# Altium PCB TYH-PD67W 2C1A 合板(2).pcbdoc
Units mm, origin at the board's own origin, x right, y up, seen from the top; angles counter-clockwise.
Board outline 94.32 x 66.89 mm, 4 copper layers (Top Layer, Layer 2, Layer 1, Bottom Layer), stack 1.045 mm thick; 43 components, 183 nets, 167 pads, 231 vias.
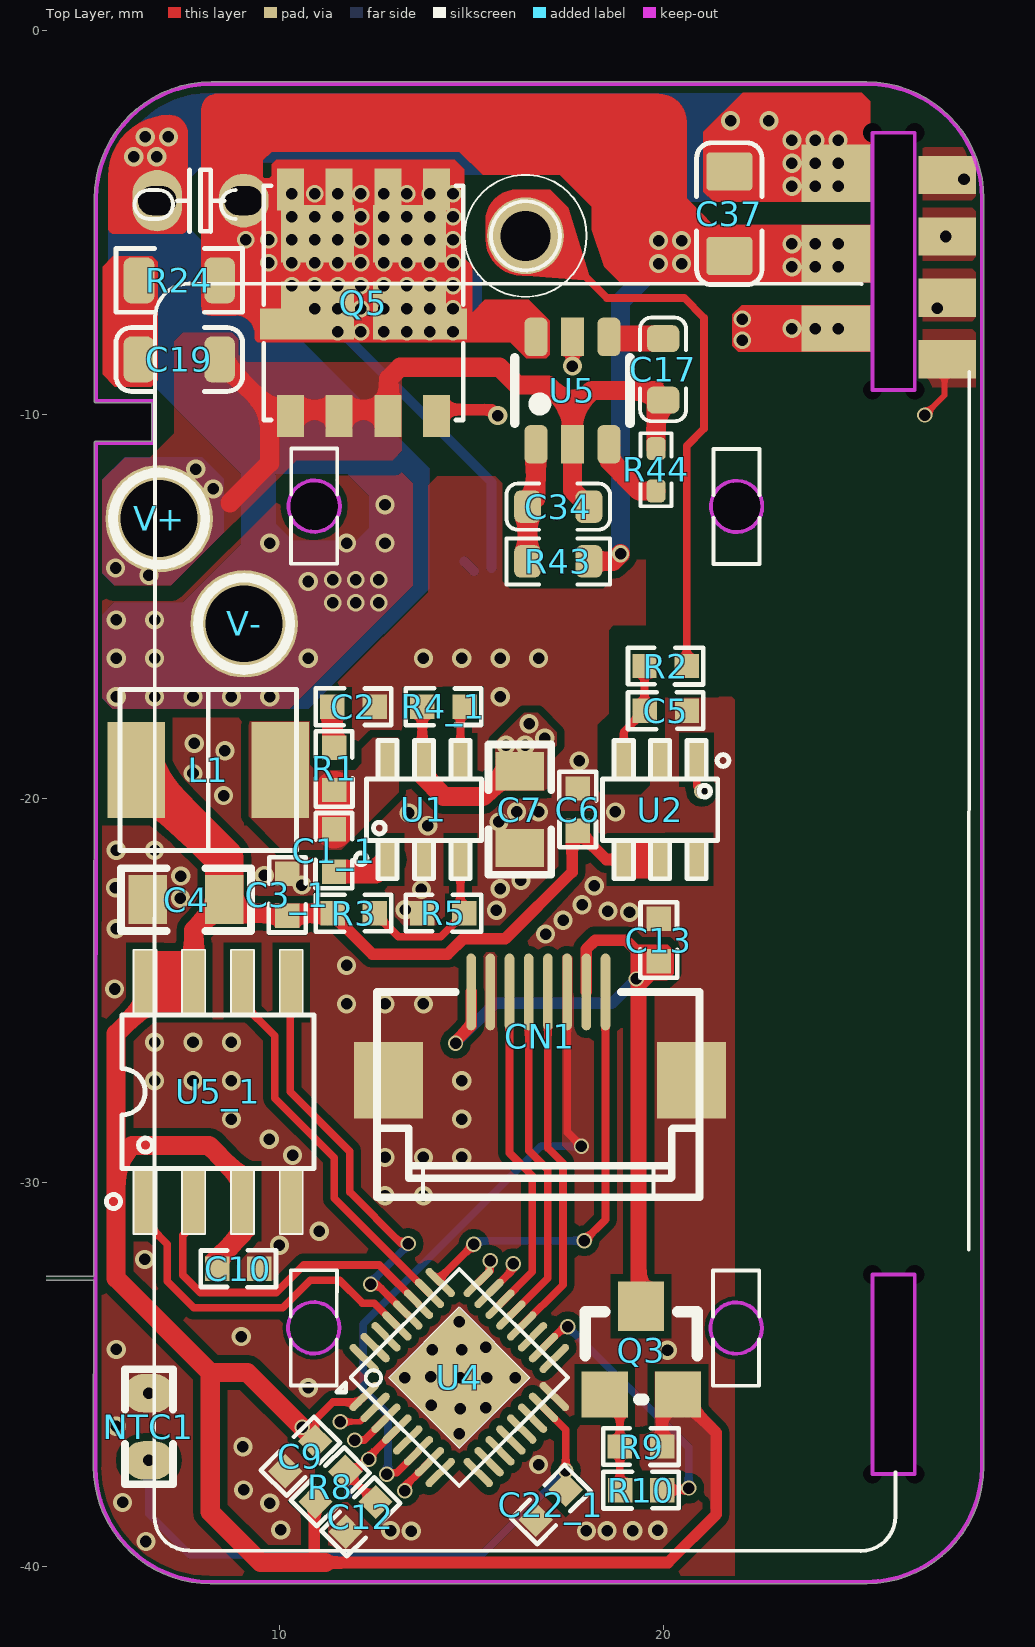
[diagram p0: Top Layer view]
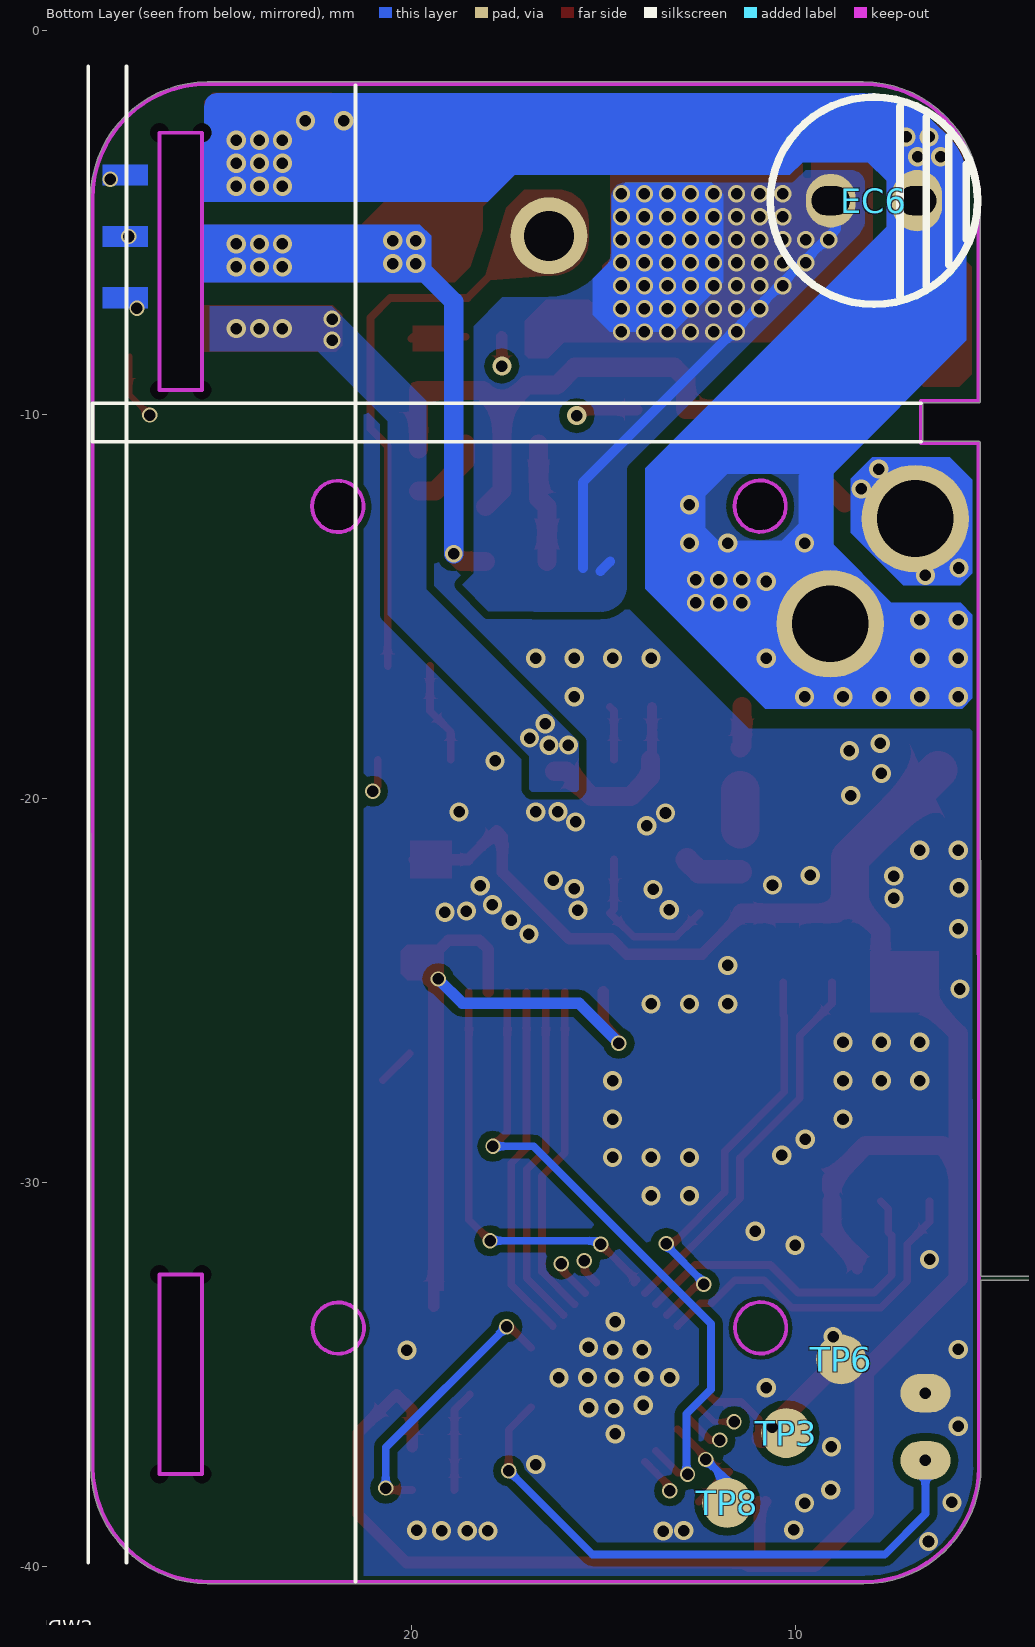
[diagram p1: Bottom Layer view, seen from below]
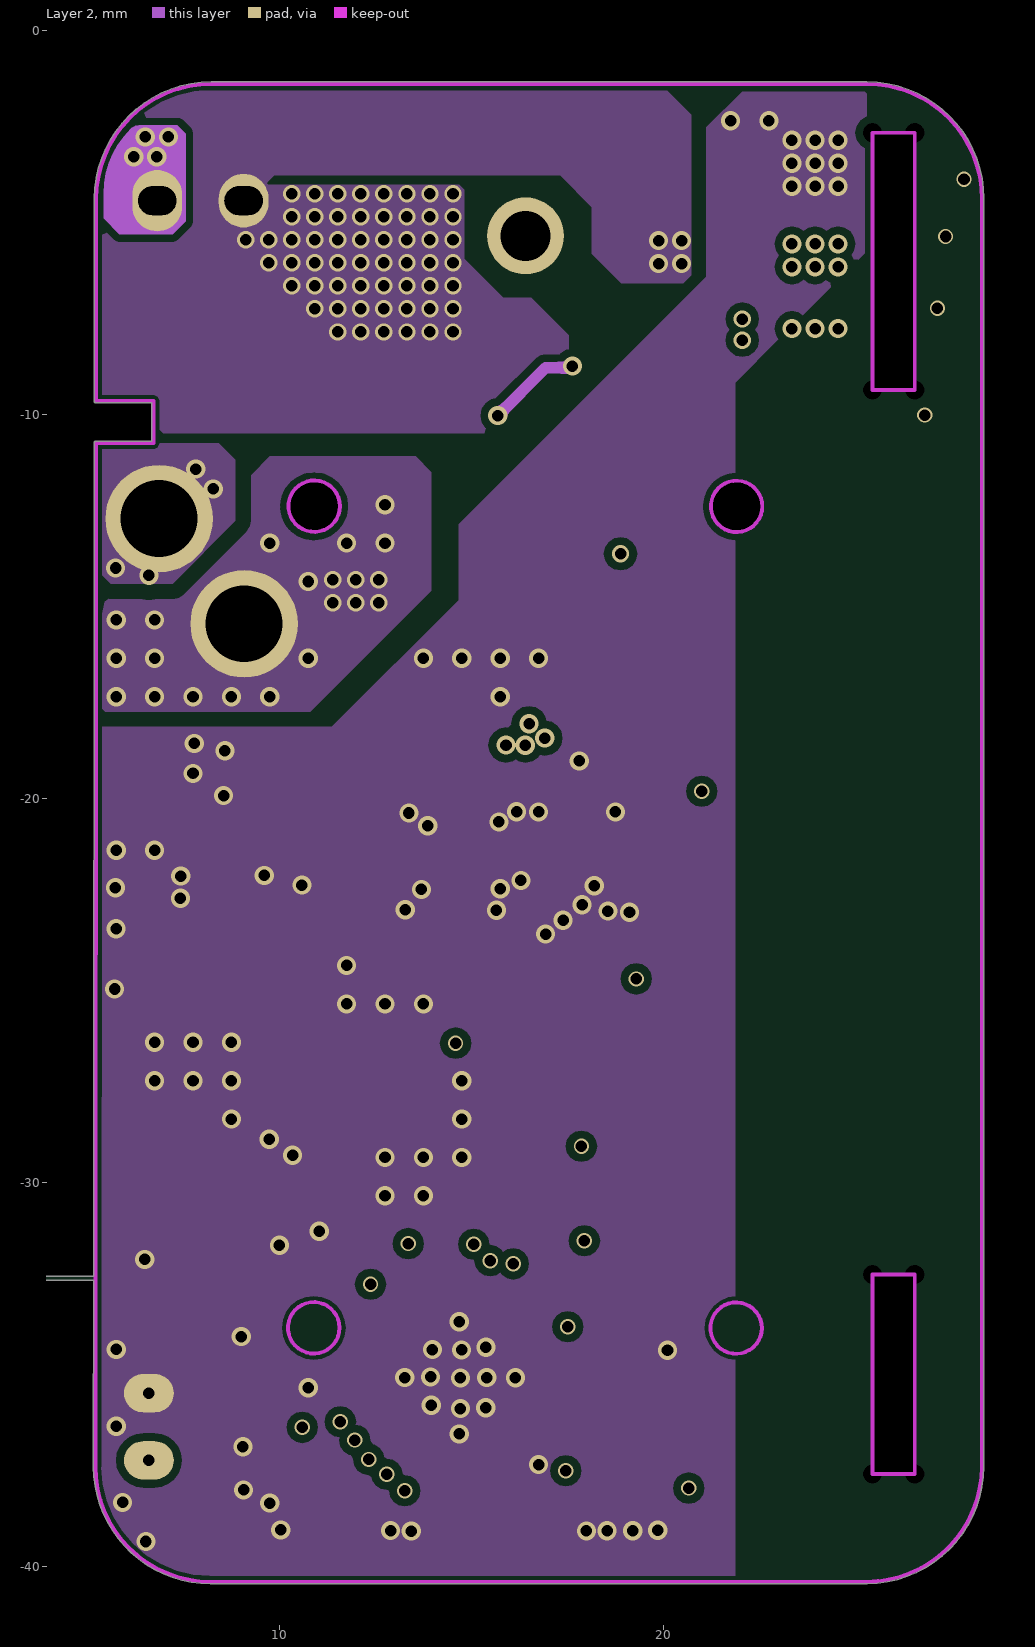
[diagram p2: Layer 2]
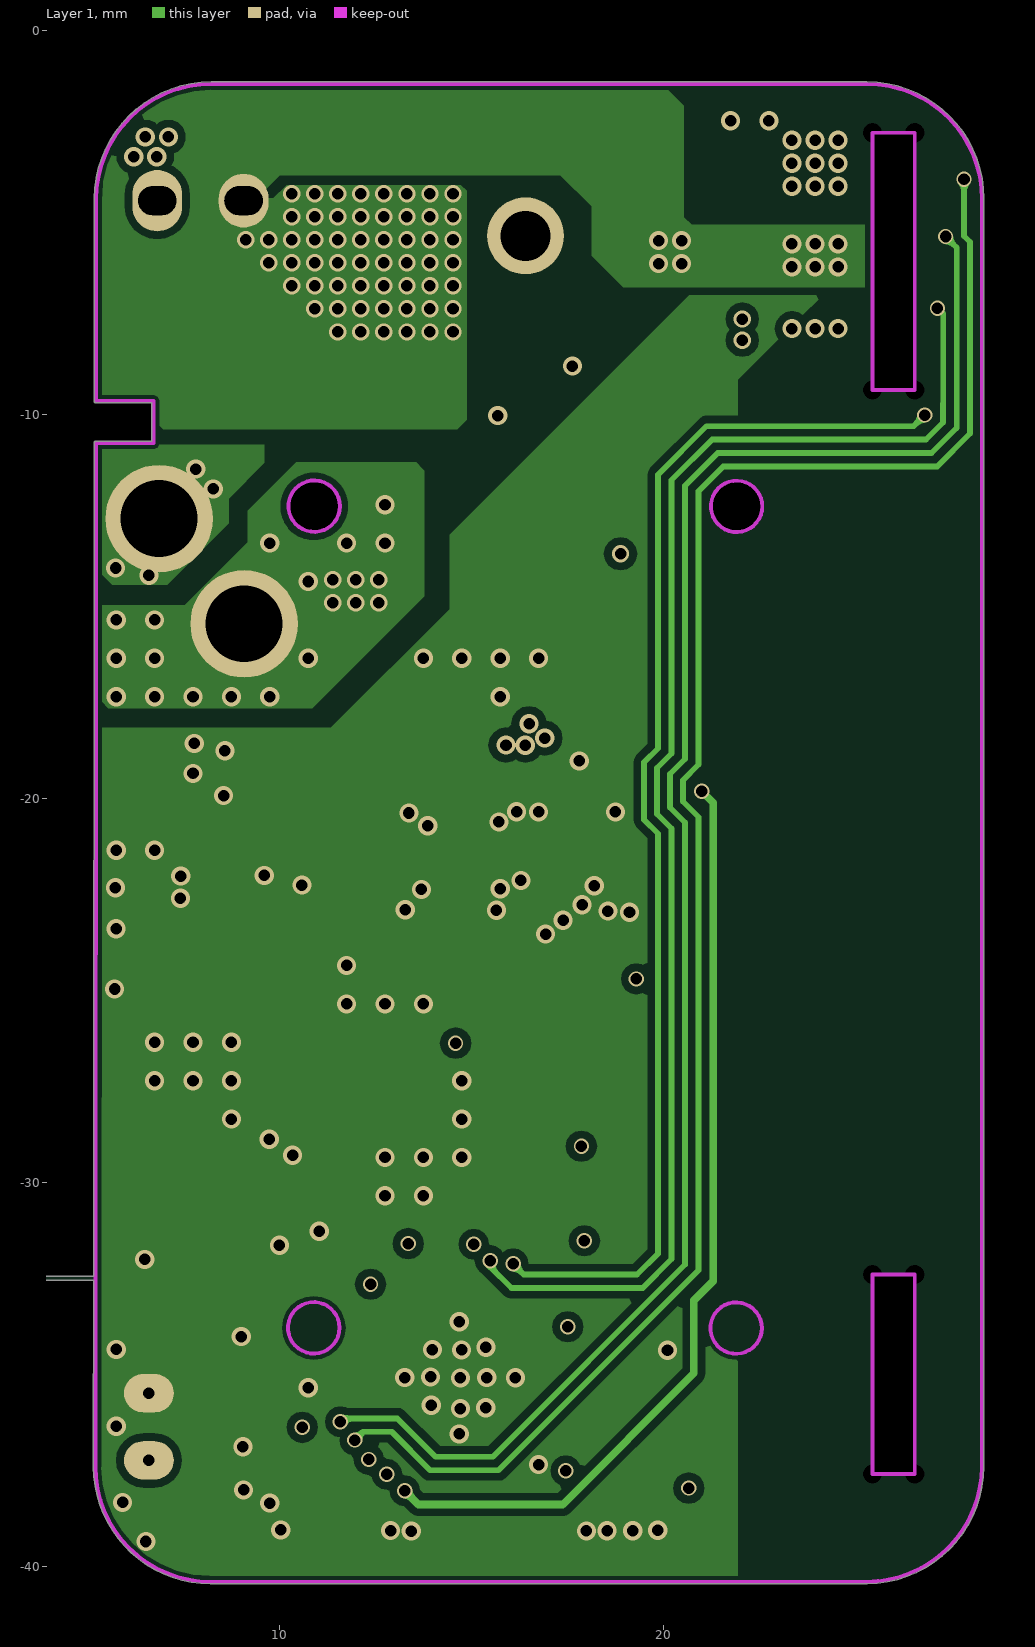
[diagram p3: Layer 1]
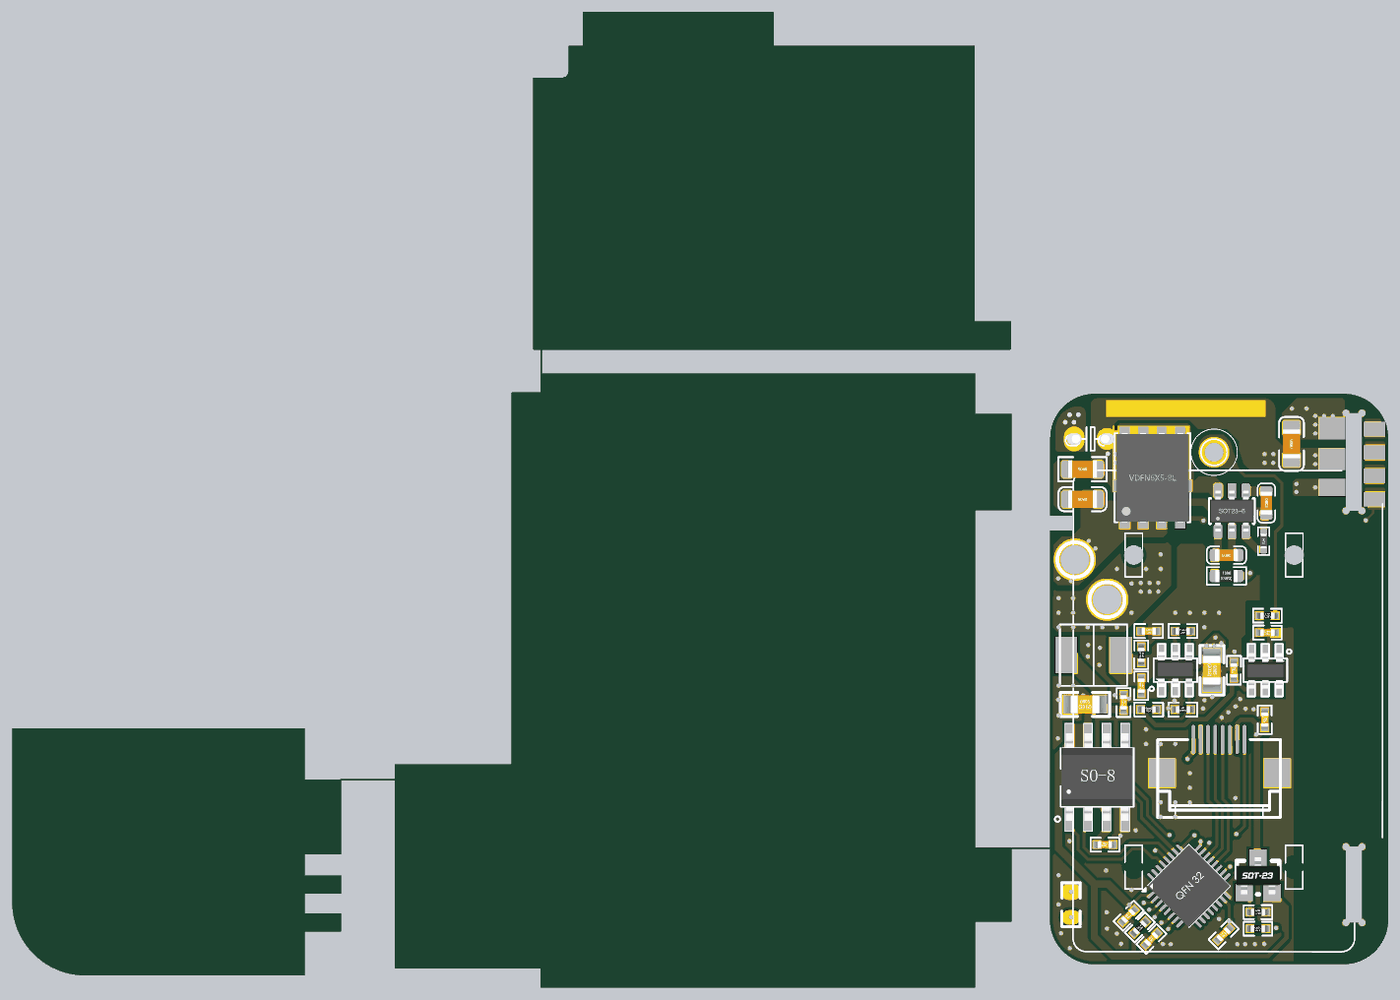
[diagram p4: 3D render of the assembled board from above, using the file's embedded part models]

## Layer stack, top to bottom
Top Solder: solder mask 0.0102, Solder Resist, Dk 3.5
Top Layer: signal copper 0.0356
Dielectric 6: prepreg 0.0711, PP-006, Dk 4.1
Layer 2: signal copper 0.035
Dielectric 5: prepreg 0.0711, PP-006, Dk 4.1
Layer 1: signal copper 0.035
Dielectric 1: core 0.254, FR-4, Dk 4.2
Dielectric 4: prepreg 0.127, Dk 4.2
Dielectric 2: core 0.254, Dk 4.2
Dielectric 3: prepreg 0.127, Dk 4.2
Bottom Layer: signal copper 0.0356
Bottom Solder: solder mask 0.0102, Solder Resist, Dk 3.5

## Board outline
-60.945,-41.225 -45.944,-41.225 ccw(c-45.944,-41.2) -45.919,-41.2 -45.919,-38.225 -43.445,-38.225 ccw(c-43.445,-38.2) -43.419,-38.2 -43.419,-37 ccw(c-43.445,-37) -43.445,-36.975 -45.919,-36.975 -45.919,-35.625 -43.445,-35.625 ccw(c-43.445,-35.6) -43.419,-35.6 -43.419,-34.4 ccw(c-43.445,-34.4) -43.445,-34.375 -45.919,-34.375 -45.919,-32.925 -43.445,-32.925 ccw(c-43.445,-32.9) -43.419,-32.9 -43.419,-27.85 -39.751,-27.85 -39.759,-40.693 ccw(c-39.709,-40.7) -39.709,-40.75 -29.759,-40.752 -29.76,-42.002 ccw(c-29.71,-42.002) -29.71,-42.052 0,-42.052 ccw(c0,-42.002) 0.05,-42.002 0.05,-37.55 2.5,-37.55 ccw(c2.5,-37.5) 2.55,-37.5 2.55,-32.55 5.163,-32.55 5.16,-37.409 ccw(c5.21,-37.409) 5.16,-37.409 ccw(c8.207,-37.409) 8.207,-40.456 ccw(c8.207,-40.406) 8.207,-40.456 ccw(c8.207,-40.406) 8.207,-40.456 25.296,-40.456 ccw(c25.296,-40.406) 25.308,-40.455 ccw(c25.296,-37.407) 28.344,-37.407 28.352,-4.393 ccw(c28.302,-4.393) 28.352,-4.393 ccw(c28.302,-4.393) 28.351,-4.381 ccw(c25.304,-4.393) 25.304,-1.346 8.229,-1.346 ccw(c8.229,-4.393) 5.181,-4.375 ccw(c5.228,-4.393) 5.178,-4.393 5.175,-9.653 ccw(c5.225,-9.653) 5.225,-9.703 6.674,-9.704 6.673,-10.703 5.225,-10.702 ccw(c5.225,-10.753) 5.174,-10.753 5.163,-32.45 0.05,-32.45 0.05,-9.32 2.5,-9.32 ccw(c2.5,-9.269) 2.55,-9.269 2.55,-2.769 ccw(c2.5,-2.769) 2.5,-2.719 0.05,-2.719 0.05,0 ccw(c0,0) 0,0.05 -29.65,0.05 -29.65,1.682 2.433,1.682 ccw(c2.433,1.733) 2.483,1.733 ccw(c2.433,1.733) 2.482,1.745 ccw(c2.45,1.784) 2.5,1.784 2.5,3.584 ccw(c2.45,3.584) 2.45,3.635 0,3.635 0,22.484 ccw(c-0.05,22.484) -0.014,22.52 ccw(c-0.05,22.484) -0.05,22.535 -13.768,22.535 -13.768,24.784 ccw(c-13.819,24.784) -13.819,24.835 -26.819,24.835 ccw(c-26.819,24.784) -26.869,24.784 -26.869,22.535 -27.789,22.535 ccw(c-27.789,22.484) -27.84,22.483 -27.84,20.784 cw(c-28.289,20.784) -28.289,20.335 cw(c-28.289,20.784) -28.289,20.335 cw(c-28.289,20.284) -28.289,20.335 -30.217,20.335 ccw(c-30.217,20.284) -30.268,20.284 -30.268,1.733 ccw(c-30.217,1.733) -30.217,1.682 -29.75,1.682 -29.75,-1.25 -31.7,-1.25 ccw(c-31.7,-1.3) -31.75,-1.3 -31.75,-26.75 -39.7,-26.75 ccw(c-39.7,-26.8) -39.75,-26.8 -39.751,-27.75 -43.445,-27.75 ccw(c-43.445,-27.8) -43.488,-27.775 -45.919,-27.775 -45.919,-24.3 ccw(c-45.945,-24.3) -45.945,-24.275 -65.945,-24.275 ccw(c-65.945,-24.3) -65.97,-24.3 -65.97,-36.2 ccw(c-60.945,-36.2)
cut-out: 25.45,-9.369 26.55,-9.369 26.55,-2.669 25.45,-2.669
cut-out: 26.55,-32.4 25.45,-32.4 25.45,-37.6 26.55,-37.6
cut-out: 22.579,-12.399 22.579,-12.398 ccw(c21.912,-12.398) 21.912,-11.731 21.902,-11.731 ccw(c21.902,-12.396) 21.237,-12.396 21.237,-12.424 ccw(c21.889,-12.424) 21.889,-13.076 21.902,-13.076 ccw(c21.902,-12.399)
cut-out: 11.579,-12.393 11.579,-12.392 ccw(c10.912,-12.392) 10.912,-11.725 10.902,-11.725 ccw(c10.902,-12.39) 10.237,-12.39 10.237,-12.418 ccw(c10.889,-12.418) 10.889,-13.07 10.902,-13.07 ccw(c10.902,-12.393)

## Design rules (kind name [scope] priority, off if disabled: settings)
Clearance Clearance_20 [InNet('VDS') vs InNet('SGND')] p1: gap=0.4
Clearance Clearance_19 [InNet('NetC4_2') vs InNet('PGND')] p2: gap=0.4
Clearance Clearance_18 [InNet('NetR15_1') vs InNet('PGND')] p3: gap=1
Clearance Clearance_17 [InNet('NetN_1') vs InNet('NetBD1_1')] p4: gap=1.55
Clearance Clearance_16 [InNet('NetN_1') vs InNet('PGND')] p5: gap=1.5
Clearance Clearance_15 [InNet('VIN') vs InNet('PGND')] p6 off: gap=5.8
Clearance Clearance_14 [InNet('CS') vs InNet('Bais-L')] p7: gap=0.45
Clearance Clearance_13 [InNet('SW') vs InNet('CS')] p8: gap=1.5
Clearance Clearance_12 [InNet('NetR15_1') vs InNet('CS')] p9: gap=1
Clearance Clearance_11 [InNet('NetBD1_3') vs InNet('CS')] p10: gap=1.1
Clearance Clearance_10 [InNet('HV') vs InNet('CS')] p11: gap=1.1
Clearance Clearance_9 [InNet('NetL2_1') vs InNet('CS')] p12: gap=1.5
Clearance Clearance_8 [InNet('NetC1_2') vs InNet('PGND')] p13: gap=1.2
Clearance Clearance_7 [InNet('NetBD1_3') vs InNet('PGND')] p14: gap=1.2
Clearance Clearance_6 [InNet('NetC2_2') vs InNet('PGND')] p15: gap=1.3
Clearance Clearance_5 [InNet('Bais-L') vs InNet('PGND')] p16: gap=0.45
Clearance Clearance_4 [InNet('SW') vs InNet('PGND')] p17: gap=1.5
Clearance Clearance_3 [InNet('HV') vs InNet('PGND')] p18: gap=1.2
Clearance Clearance_2 [InNet('NetL2_1') vs InNet('PGND')] p19: gap=1.5
Clearance Clearance_1 [OnLayer('Keep-Out Layer')] p20: gap=0.1
Clearance [All] p21: gap=0.2
PlaneConnect [All] p1: planeconnectstyle=Direct reliefexpansion=0.508 reliefentries=4 reliefconductorwidth=0.3 reliefairgap=0.254
PolygonConnect [All] p1: connectstyle=Direct reliefconductorwidth=0.3 reliefentries=4 polygonreliefangle="90 Angle" airgapwidth=0.3
RoutingVias [All] p1: holewidth=0.3 width=0.4 viastyle="Through Hole" minholewidth=0.3 minwidth=0.4 maxholewidth=0.3 maxwidth=0.4
SolderMaskExpansion [All] p1: expansion=0.05
Width [All] p1: maxlimit=10 minlimit=0.1 preferedwidth=0.2
28 further rules are at their usual default settings.

## Components (designator, comment, footprint, x,y, rotation, side; value= is the part's Value field where it differs from the comment)
C1_1 "100nF" 0402C#1 11.448,-21.343 r270 top (schematic designator C1)
C2 "1NF" 0402C#1 11.95,-17.641 r180 top
C3_1 "100NF" 0402C#1 10.232,-22.494 r270 top (schematic designator C3)
C4 "22uF" 0805C#1 7.494,-22.624 r0 top
C5 "10PF" 0402C#2 20.085,-17.743 r180 top
C6 "105P" 0402C#1 17.748,-20.318 r90 top
C7 "10uF" 0805C#1 16.281,-20.22 r270 top
C9 "100NF" 0402C#1 10.515,-37.139 r45 top
C10 "105PF" 0402C#1 8.911,-32.231 r0 top
C12 "100NF" 0402C#1 12.085,-38.713 r45 top
C13 "105P" 0402C#1 19.906,-23.672 r270 top
C17 "2.2nF/250V/0805" 0603CX#1 19.995,-8.031 r270 top (schematic designator C10)
C19 "2.2nF/250V/0805" 0805CX 8.445,-8.572 r180 top (schematic designator C10)
C22_1 "100NF" 0402C#1 17.039,-38.398 r45 top (schematic designator C22)
C34 "2.2nF/250V/0805" 0603CX#2 17.262,-12.406 r180 top (schematic designator C10)
C37 "2.2nF/250V/0805" 0805C#2 20.869,-6.628 r90 top (schematic designator C10)
CN1 "8.07A0.006200" "70W 屏座" 16.693,-25.17 r270 top locked
EC6 "560uF/25V/6.3*16" EG-5*17L 7.946,-4.438 r90 bottom
L1 "4.7uH" 电感0420 8.148,-19.265 r180 top
NTC1 "100K" NTC1 6.604,-36.405 r90 top
Q3 "APM2301" SOT23-MOS 19.34,-34.87 r0 top
Q5 "Comment" DFN5*6 10.286,-10.048 r0 top
R1 "2R" 0402R#1 11.449,-19.214 r270 top
R2 "0R" 0402R#2 20.041,-16.533 r0 top
R3 "47k" 0402R#1 11.958,-23.017 r180 top
R4_1 "100k" 0402R#1 14.294,-17.641 r180 top (schematic designator R4)
R5 "12k" 0402R#1 14.25,-22.968 r0 top
R8 "10k" 0402R#1 11.36,-37.931 r225 top
R9 "100K" 0402R#1 19.401,-36.861 r0 top
R10 "1K" 0402R#1 19.445,-38.041 r180 top
R24 "10R/1206" 0805RX 8.445,-6.513 r180 top (schematic designator R6)
R43 "51R/0402" 0603RX 17.263,-13.831 r0 top (schematic designator R9)
R44 "51R/0402" 0402R#3 19.81,-10.896 r270 top (schematic designator R9)
TP3 "V3V" 焊盘1.5*2.5mm 10.231,-36.534 r180 bottom
TP6 "GND" 焊盘1.5*2.5mm 8.802,-34.614 r180 bottom
TP8 "RST" 焊盘1.5*2.5mm 11.768,-38.353 r180 bottom
U1 "ME3121" SOT23-6 13.781,-20.298 r90 top
U2 "HD9210" SOT23-6 19.905,-20.294 r270 top
U4 "PY32F032" "QFN32 4*4" 12.212,-35.581 r315 top
U5 "Comment" SOT-23-6S 16.683,-10.783 r90 top
U5_1 "P25Q64H-SUH-IT" SOP8 8.33,-27.62 r90 top (schematic designator U5)
V+ "Comment" PAD-AC 6.869,-12.718 r0 top
V- "Comment" PAD-AC 9.083,-15.458 r0 top

## Footprints (in the part's own frame and the unit in brackets; to place one, negate y for a bottom-side part, rotate by r counter-clockwise, add the part's x,y. Pads: shape width x height; smd on the part's side, far side on the other; paste and mask are expansions set on the pad)
"70W 屏座" [mm]
  oval 2x0.25 smd: 1(-0.124,-1.698) 2(-0.124,-1.198) 3(-0.124,-0.698) 4(-0.124,-0.198) 5(-0.124,0.302) 6(-0.124,0.802) 7(-0.124,1.302) 8(-0.124,1.802)
  rect 2x1.8 smd: 2(2.176,-3.855) 2(2.176,4.045)
  silkscreen extent -0.12,-4.15 5.23,4.25
0402C#1 [mm]
  rect 0.635x0.635 smd paste-0.067 mask-0.018: 1(-0.531,-0.023) 2(0.571,-0.023)
  silkscreen extent -0.96,-0.51 1,0.46, body extent -0.72,-0.27 0.74,0.23, height 0.51
0402C#2 [mm]
  rect 0.635x0.635 smd paste-0.067: 1(-0.531,-0.023)
  rect 0.635x0.635 smd paste-0.067 mask-0.018: 2(0.571,-0.023)
  silkscreen extent -0.96,-0.51 1,0.46, body extent -0.72,-0.27 0.74,0.23, height 0.51
0402R#1 [mm]
  rect 0.635x0.635 smd paste-0.067 mask-0.018: 1(-0.531,-0.023) 2(0.571,-0.023)
  silkscreen extent -0.96,-0.51 1,0.46, body extent -0.7,-0.27 0.76,0.23, height 0.51
0402R#2 [mm]
  rect 0.635x0.635 smd paste-0.067 mask-0.018: 1(-0.531,-0.023)
  rect 0.635x0.635 smd paste-0.067: 2(0.571,-0.023)
  silkscreen extent -0.96,-0.51 1,0.46, body extent -0.7,-0.27 0.76,0.23, height 0.51
0402R#3 [mm]
  rrect50% 0.6x0.5 smd: 1(0,0) 2(1.1,0)
  silkscreen extent -0.4,-0.4 1.5,0.4, body extent 0.05,-0.25 1.05,0.25, height 0.3
0603CX#1 [mm]
  rrect50% 0.7x0.85 smd: 1(0,0) 2(1.6,0)
  silkscreen extent -0.55,-0.6 2.15,0.6, body extent 0,-0.41 1.6,0.41, height 0.81
0603CX#2 [mm]
  rrect50% 0.7x0.85 smd: 1(-0.8,0) 2(0.8,0)
  silkscreen extent -1.35,-0.6 1.35,0.6, body extent -0.8,-0.41 0.8,0.41, height 0.81
0603RX [mm]
  rrect50% 0.7x0.85 smd: 1(-0.8,0) 2(0.8,0)
  silkscreen extent -1.35,-0.6 1.35,0.6, body extent -0.77,-0.42 0.78,0.43, height 0.45
0805C#1 [mm]
  rect 1x1.27 smd: 1(-0.924,-0.016) 2(1.076,-0.016)
  silkscreen extent -1.62,-0.83 1.77,0.8, body extent -1.33,-0.65 1.48,0.6, height 0.8
0805C#2 [mm]
  rrect20% 1x1.2 smd: 1(0.75,-0.85) 2(2.95,-0.85)
  silkscreen extent 0,-1.7 3.7,0, body extent 0.85,-1.46 2.85,-0.24, height 0.51
0805CX [mm]
  rrect50% 0.8x1.2 smd: 1(0,0) 2(2.1,0)
  silkscreen extent -0.6,-0.83 2.7,0.83, body extent 0.05,-0.61 2.05,0.61, height 0.51
0805RX [mm]
  rrect50% 0.8x1.2 smd: 1(0,0) 2(2.1,0)
  silkscreen extent -0.6,-0.83 2.7,0.83, body extent 0.05,-0.61 2.05,0.61, height 0.51
DFN5*6 [mm]
  rect 0.7x1.1 smd: 1(0,0) 2(1.27,0) 3(2.54,0) 4(3.81,0) 5(3.81,5.9) 6(2.54,5.9) 7(1.27,5.9) 8(0,5.9)
  rect 1x0.8 smd: 8(-0.295,2.402) 8(4.105,2.402)
  rect 1.9x1.5 smd: 8(0.705,2.75) 8(0.705,4.75) 8(3.105,2.75) 8(3.105,4.75)
  silkscreen extent -0.69,-0.1 4.51,6, body extent -0.59,-0.1 4.41,6, height 1.06
EG-5*17L [mm]
  oval 1.4x1.3 hole 0.75 slot 1 at 90 deg: 1(0,1.125)
  oval 1.6x1.3 hole 0.75 slot 1 at 90 deg: 2(0,-1.125)
  silkscreen extent -2.7,-2.7 2.7,2.7, body extent -2.7,-2.7 2.7,2.7, height 17
NTC1 [mm]
  oval 1x1.3 hole 0.3: 1(-0.84,0) 2(0.91,0)
  silkscreen extent -1.47,-0.63 1.53,0.62
PAD-AC [mm]
  round 2.8 hole 2: 1(0,0)
  silkscreen extent -1.2,-1.2 1.2,1.2
"QFN32 4*4" [mm]
  oval 0.2x1 smd: 1(0,0) 2(0.4,0) 3(0.8,0) 4(1.2,0) 5(1.6,0) 6(2,0) 7(2.4,0) 8(2.8,0) 17(2.8,4.2) 18(2.4,4.2) 19(2,4.2) 20(1.6,4.2) 21(1.2,4.2) 22(0.8,4.2) 23(0.4,4.2) 24(0,4.2)
  oval 1x0.2 smd: 9(3.5,0.7) 10(3.5,1.1) 11(3.5,1.5) 12(3.5,1.9) 13(3.5,2.3) 14(3.5,2.7) 15(3.5,3.1) 16(3.5,3.5) 25(-0.7,3.5) 26(-0.7,3.1) 27(-0.7,2.7) 28(-0.7,2.3) 29(-0.7,1.9) 30(-0.7,1.5) 31(-0.7,1.1) 32(-0.7,0.7)
  rect 2.6x2.6 smd: 33(1.4,2.1)
  silkscreen extent -0.6,-0.42 3.4,4.1, body extent -0.59,0.09 3.41,4.09, height 0.57
SOP8 [mm]
  rect 1.7x0.6 smd: 1(-2.875,1.83) 2(-2.875,0.56) 3(-2.875,-0.71) 4(-2.875,-1.98) 5(2.825,-1.98) 6(2.825,-0.71) 7(2.825,0.56) 8(2.825,1.83)
  silkscreen extent -3.73,-2.58 3.68,2.83, body extent -3.01,-2.52 2.99,2.38, height 1.7
SOT23-6 [mm]
  rect 1x0.5 smd: 1(-1.298,0.964) 2(-1.298,0.014) 3(-1.298,-0.936) 4(1.302,-0.936) 5(1.302,0.014) 6(1.302,0.964)
  silkscreen extent -1.8,-1.49 1.8,1.8, body extent -1.16,-1.37 1.26,1.43, height 1.09
SOT23-MOS [mm]
  rect 1.2x1.3 smd: D(0.075,1.64)
  rect 1.2x1.2 smd: G(-0.865,-0.66) S(1.04,-0.66)
  silkscreen extent -1.37,-0.79 1.55,1.5, body extent -1.41,-0.79 1.59,1.76, height 1
SOT-23-6S [mm]
  rrect50% 1x0.6 smd: 1(0,0) 3(0,-1.9) 4(2.8,-1.9) 6(2.8,0)
  rect 1x0.6 smd: 2(0,-0.95) 5(2.8,-0.95)
  silkscreen extent 0.55,-2.45 2.25,0.55, body extent -0.01,-2.45 2.8,0.55, height 1.15
焊盘1.5*2.5mm [mm]
  round 1.3 smd: 1(0,0)
电感0420 [mm]
  rect 1.5x2.5 smd: 1(-1.875,0) 2(1.875,0)
  silkscreen extent -2.3,-2.1 2.3,2.1

## Part data
C1_1: library part 22nF, "贴片电容：100NF/25V-X7R-0402"
C2: library part C0402, "贴片电容：1NF/50V-X7R-0402"
C3_1 C9: library part 0.1u, "贴片电容：100NF/10V-X5R-0402"
C4: "贴片电容：22UF/10V-X7R-0805"
C5: library part CAP, "贴片电容：10PF/10V-X5R-0402"
C6 C13: library part CAP, "贴片电容：105P/10V-X5R-0402"
C7: "贴片电容：10UF/35V-X7R-0805"
C10: library part 0.1u, "贴片电容：105P/10V-X5R-0402"
C12 C22_1: library part 10uF, "贴片电容：100NF/10V-X7R-0805"
C17 C19 C34 C37: library part CAP
EC6: library part CAPACITOR, "C?"
L1: "贴片电感：0420-4.7UH"
NTC1: library part RES_0603, "贴片NTC:100K-3950"
Q3: library part MOS_P, "贴片MOS：APM2301-SOT23-3"
R1: library part R0402, "贴片电阻：2R-0402-F"
R2: library part R, "贴片电阻：0R-0402-F"
R3: library part 75k, "贴片电阻：47K-0402-1%"
R4_1: "贴片电阻：100K-0402-1%"
R5: library part 10k, "贴片电阻：12K-0402-1%"
R8: "贴片电阻：10K-0402-F"
R9: library part R, "贴片电阻：100K-0402-F"
R10: library part R, "贴片电阻：1K-0402-F"
R24 R43 R44: library part Res1, "Resistor"
TP3 TP6 TP8: library part TP
U1: library part TD8113, "贴片IC：ME3121-SOT23-6"
U2: library part SOT23-MCU, "贴片触摸：HD9210-SOT23-6"
U4: library part PY32F031, "贴片IC：PY32F032-QFN32-4*4"

## Free pads (board coordinates)
  round 2 hole 1.3: 0(16.412,-5.352)
  rect 1.8x1.2 smd: 3(24.5,-7.769)
  rect 1.8x1.5 smd: 3(24.5,-5.819) 3(24.5,-3.719)
  rect 1.5x1 smd: 3(27.4,-8.569) 3(27.4,-6.969) 3(27.4,-5.369) 3(27.4,-3.769)
  round 0.2 hole 0.5: 8(26.55,-9.369) 9(25.45,-9.369) 10(25.45,-2.669) 11(26.55,-2.669) 12(25.45,-32.4) 13(26.55,-32.4) 14(25.45,-37.6) 15(26.55,-37.6)

## Via types
v1: diameter 0.5, hole 0.3, Top Layer to Bottom Layer, tented both sides, 143 vias
v2: diameter 0.45, hole 0.3, Top Layer to Bottom Layer, tented both sides, 65 vias
v3: diameter 0.4, hole 0.3, Top Layer to Bottom Layer, tented both sides, 23 vias

## Nets (pads, with @x,y where several pads share a name; then routed paths per layer and width w, separated by ;. In a path a pad name is that pad's centre, name@x,y a point inside that pad or via, vN(x,y) a via of type N, cw(c..) or ccw(c..) an arc to the next point about the centre after c; other vN are vias at no path point)
3.3V: 
A: 
A+: 
A-: 
BACK_LED: U4.19
Bais-L: 
BOOT0: U4.31
BUTTON: U2.1 U4.7 | length 26.5
  Top Layer w0.2: v3(13.266,-38.037) 13.304,-37.999 13.304,-37.883 13.626,-37.561 U4.7 ; U2.1 20.869,-19.683 v3(21.002,-19.816)
  Layer 1 w0.2: v3(13.266,-38.037) 13.625,-38.395 17.376,-38.395 20.794,-34.978 20.794,-33.08 21.301,-32.573 21.301,-20.115 v3(21.002,-19.816)
CC1: 
CC2: 
CPA: 
CS: 
D: 
D25_INT: C22_1.2 NTC1.1 U4.15 | length 15.5
  Top Layer w0.2: U4.15 17.459,-36.445 v3(17.459,-37.513)
  Bottom Layer w0.2: NTC1.1 6.604,-38.632 7.67,-39.698 15.274,-39.698 v3(17.459,-37.513)
D31_EN1: U4.11
D31_EN2: U4.10
D31_INT1: U4.13
D+: 
D-: 
DM: 
DP: 
EM: 
EN: 
EN_IC: 
FB: 
FLASH_CLK: U4.26 U5_1.6 | length 10.1
  Top Layer w0.2: U5_1.6 9.04,-25.345 9.88,-26.185 9.88,-27.814 11.433,-29.366 11.433,-30.419 U4.26
FLASH_CS: U4.29 U5_1.1 | length 9.4
  Top Layer w0.2: U5_1.1 6.5,-31.034 7.082,-31.615 7.082,-32.581 7.772,-33.272 10.089,-33.272 10.805,-32.555 11.568,-32.555 12.168,-33.155 12.473,-33.155 U4.29
FLASH_MISO: U4.27 U5_1.2 | length 9.1
  Top Layer w0.2: U5_1.2 7.57,-30.695 7.57,-31.3 7.482,-31.389 7.482,-32.416 7.938,-32.872 9.923,-32.872 10.64,-32.155 12.604,-32.155 U4.27
FLASH_MOSI: U4.28 U5_1.5 | length 11
  Top Layer w0.2: U5_1.5 10.31,-25.645 10.28,-25.675 10.28,-27.648 11.833,-29.201 11.833,-30.253 13.178,-31.598 v3(13.358,-31.598) ; v3(12.375,-32.655) 12.538,-32.655 U4.28
  Bottom Layer w0.2: v3(12.375,-32.655) 12.375,-32.618 13.358,-31.635 v3(13.358,-31.598)
G-SR: Q5.4 U5.5 | length 4.9
  Top Layer w0.3: Q5.4@14.119,-9.878 15.529,-9.878 v1(15.686,-10.035) ; v1(17.633,-8.744) U5.5
  Layer 2 w0.3: v1(15.686,-10.035) 16.933,-8.788 v1@17.707,-8.788
GND: 
GND-C: 
HV: 
ISET: 
KEY: 
KEY1: 
LCD_CLK: 
LCD_CS: CN1.8 U4.25 | length 11.1
  Top Layer w0.2: U4.25 14.12,-32.54 14.143,-32.54 v3(15.065,-31.618) ; v3(17.944,-31.523) 18.495,-30.973 CN1.8
  Bottom Layer w0.2: v3(15.065,-31.618) 15.119,-31.618 15.213,-31.523 v3(17.944,-31.523)
LCD_DC: CN1.4 U4.21 | length 9
  Top Layer w0.2: U4.21 16.989,-32.501 16.989,-29.668 16.495,-29.174 CN1.4
LCD_EN2: R10.1 U4.18 | length 7.1
  Top Layer w0.2: U4.18 17.425,-33.762 v3(17.514,-33.762) ; R10.1 20.608,-38.018 v3(20.661,-37.965)
  Bottom Layer w0.2: v3(17.514,-33.762) 20.661,-36.909 v3(20.661,-37.965)
LCD_MOSI: CN1.5 U4.20 | length 9.3
  Top Layer w0.2: U4.20 17.389,-32.667 17.389,-29.502 16.995,-29.108 CN1.5
LCD_RES: CN1.3 U4.22 | length 8.7
  Top Layer w0.2: U4.22 16.589,-32.335 16.589,-29.834 15.995,-29.239 CN1.3
LCD_TE: U4.17
LEDA: 
M: 
N: 
NetBD1_1: 
NetBD1_3: 
NetBD2_1: 
NetC1_1: C1_1.1 L1.1 R1.2 U1.6 | length 1
  Top Layer w1: C1_1.1 R1.2
NetC1_2: C1_1.2 U1.1 | length 1.5
  Top Layer w0.6: C1_1.2 12.499,-21.914 U1.1
NetC2_2: C2.2 R1.1 | length 1.1
  Top Layer w0.5: C2.2 11.379,-18.636 R1.1
NetC3_2: 
NetC4_1: 
NetC4_2: 
NetC5_2: C5.2 R2.1 U2.3 | length 2.7
  Top Layer w0.2: U2.3 18.969,-18.265 C5.2 19.51,-17.716 R2.1
NetC6_1: 
NetC10_2: C19.2 R24.2 | length 2.1
  Top Layer w0.254: C19.2@6.306,-8.553 R24.2@6.306,-6.494
NetC21_1: 
NetC22_1: 
NetC24_1: 
NetC25_2: 
NetC26_2: 
NetC30_2: 
NetC31_2: 
NetC100_2: 
NetC101_1: 
NetC101_2: 
NetC112_1: 
NetD4_K: 
NetF1_1: 
NetF1_2: 
NetKEY1_1: pad.0 R2.2 | length 14.8
  Top Layer w0.2: pad.0 16.906,-5.352 18.523,-6.97 20.545,-6.97 21.058,-7.484 21.058,-10.379 20.612,-10.825 R2.2
NetL2_1: 
NetLF1_2: 
NetN_1: 
NetNTC2_1: 
NetQ1_3: 
NetQ3_4: 
NetQ3_G: Q3.G R9.1 R10.2 | length 2.7
  Top Layer w0.2: Q3.G 18.87,-35.925 R9.1 18.87,-38.014 R10.2
NetR2_2: 
NetR3_1: R3.1 R5.2 U1.3 | length 4.3
  Top Layer w0.2: R3.1 13.103,-23.609 14.203,-23.609 R5.2 14.716,-22.887 U1.3
NetR4_1: R4_1.1 U1.4 | length 1.4
  Top Layer w0.2: U1.4 14.716,-17.727 R4_1.1
NetR15_1: 
NetR25_2: 
NetR29_1: 
NetR31_2: 
NetR32_2: 
NetR41_2: 
NetR42_2: 
NetR134_1: 
NetRX1_2: 
NetRX3_2: 
NetU1_26: 
NetU1_27: 
NetU1_28: 
NetU1_29: 
NetU1_30: 
NetU1_32: 
NewNet1: 
NewNet2: 
NewNet3: 
NewNet4: 
NewNet5: 
NewNet6: 
NewNet7: 
NewNet8: 
NewNet9: 
NewNet10: 
NewNet11: 
NewNet12: 
NewNet13: 
NewNet14: 
NewNet15: 
NewNet16: 
NewNet18: 
NewNet22: 
NewNet23: 
NewNet24: 
NewNet25: 
NewNet28: 
NewNet32: 
NewNet33: 
NewNet34: 
NewNet36: 
NewNet38: 
NewNet40: 
NewNet41: 
NewNet42: 
OPTO: 
OTP: 
PA2: 
PA4: 
PA5: 
PA6: 
PA7: 
PA8: 
PA9: 
PB0: 
PB1: 
PB7: U4.30
PB8: 
PF0: 
PF1: 
PF3: U4.5
PGND: 
RS: 
RST: C12.2 R8.1 TP8.1 U4.4 | length 4.1
  Top Layer w0.2: C12.2 R8.1 11.95,-37.54 U4.4
  Bottom Layer w0.2: TP8.1@11.787,-38.146 11.787,-37.763 v3(12.33,-37.22)
RX: U4.9
SCL: pad.3@27.4,-3.769 U4.3 | length 48.1
  Top Layer w0.2: v3(11.967,-36.715) 12.209,-36.715 U4.3 ; pad.3@27.4,-3.769 27.511,-3.88 v3(27.832,-3.88)
  Layer 1 w0.15: v3(11.967,-36.715) 12.181,-36.501 12.927,-36.501 13.926,-37.5 15.708,-37.5 20.916,-32.291 20.916,-20.492 20.511,-20.086 20.511,-19.53 20.916,-19.124 20.916,-12.005 21.563,-11.359 27.133,-11.359 27.989,-10.502 27.989,-5.515 27.832,-5.357 v3(27.832,-3.88)
SCL1: CN1.6 U4.6 | length 17.1
  Top Layer w0.2: v3(12.801,-37.607) 12.839,-37.569 13.053,-37.569 U4.6 ; CN1.6 17.495,-28.692 v3(17.868,-29.066)
  Bottom Layer w0.2: v3@12.8,-37.681 12.8,-37.599 12.83,-37.569 12.83,-36.037 12.19,-35.397 12.19,-33.689 16.813,-29.066 v3(17.868,-29.066)
SDA: pad.3@27.4,-5.369 U4.2 | length 46
  Top Layer w0.15: v3(11.59,-36.24) 12.105,-36.24 12.481,-35.864 U4.2
  Layer 1 w0.15: v3(11.59,-36.24) 11.679,-36.151 13.072,-36.151 14.071,-37.15 15.563,-37.15 20.567,-32.147 20.567,-20.629 20.177,-20.24 20.177,-19.366 20.567,-18.977 20.567,-11.86 21.418,-11.009 26.988,-11.009 27.639,-10.357 27.639,-5.66 v3(27.35,-5.37)
SDA1: 
SET: R44.2 U5.3 | length 2
  Top Layer w0.5: U5.3 18.583,-11.209 19.37,-11.996 R44.2
SGND: C2.1 C3_1.1 C4.1 C5.1 C6.2 C7.2 C9.1 C10.2 C12.1 C13.1 C22_1.1 C37.2 CN1.2 EC6.2 NTC1.2 pad.3@24.5,-3.719 R5.1 TP6.1 U1.2 U2.2 U4.16 U4.33 U5_1.4 V-.1 | length 13.2
  Top Layer w0.2: CN1.2@20.042,-26.649 CN1.2@20.738,-27.346
  Bottom Layer w0.2: 11.742,-10.813 13.025,-12.096 13.025,-14.004
  Bottom Layer w0.254: EC6.2@6.68,-4.446 6.68,-5.751 11.742,-10.813
  other v1: 6.525,-39.357 12.897,-39.072 13.435,-39.086 18,-39.081 18.537,-39.077 19.206,-39.075 19.856,-39.064 10.036,-39.056 9.752,-38.355 5.916,-38.339 9.069,-38.012 16.752,-37.355 9.052,-36.892 14.683,-36.555 5.752,-36.355 14.718,-35.897 15.376,-35.875 13.957,-35.808 10.752,-35.355 13.264,-35.088 14.717,-35.098 15.403,-35.088 16.149,-35.094 13.939,-35.071 14.747,-34.368 20.11,-34.379 5.752,-34.355 13.986,-34.359 15.38,-34.3 9.011,-34.019 14.684,-33.635 6.498,-32.012 10.002,-31.643 11.039,-31.277 12.752,-30.355 13.752,-30.355 12.752,-29.355 13.752,-29.355 14.752,-29.355 10.345,-29.296 9.737,-28.882 8.752,-28.355 14.752,-28.355 6.752,-27.355 7.752,-27.355 8.752,-27.355 14.752,-27.355 6.752,-26.355 7.752,-26.355 8.752,-26.355 11.752,-25.355 12.752,-25.355 13.752,-25.355 5.708,-24.968 11.752,-24.355 16.933,-23.537 5.748,-23.399 17.39,-23.178 19.12,-22.971 18.559,-22.94 15.655,-22.916 13.28,-22.901 17.883,-22.776 7.425,-22.606 13.699,-22.376 15.752,-22.355 5.733,-22.331 18.2,-22.276 10.588,-22.261 16.293,-22.14 7.433,-22.026 9.606,-22.009 5.752,-21.355 6.752,-21.355 13.864,-20.717 15.718,-20.615 13.375,-20.384 16.178,-20.35 16.752,-20.355 18.752,-20.355 8.548,-19.931 7.752,-19.355 17.812,-19.026 8.584,-18.765 7.782,-18.573 5.752,-17.355 6.752,-17.355 7.752,-17.355 8.752,-17.355 9.752,-17.355 15.752,-17.355 5.752,-16.355 6.752,-16.355 10.752,-16.355 13.752,-16.355 14.752,-16.355 15.752,-16.355 16.752,-16.355 5.752,-15.355 6.752,-15.355 10.752,-14.355 9.752,-13.355 11.752,-13.355 12.752,-13.355 12.752,-12.355 23.352,-4.062 23.952,-4.062 24.552,-4.062 23.352,-3.462 23.952,-3.462 24.552,-3.462 6.209,-3.295 6.809,-3.295 23.352,-2.862 23.952,-2.862 24.552,-2.862 6.51,-2.778 7.11,-2.778 21.752,-2.355 22.752,-2.355
  other v2: 11.389,-14.907 11.989,-14.907 12.589,-14.907 11.389,-14.307 11.989,-14.307 12.589,-14.307
SRCG_A: 
SW: 
SW-SR: 
SWCLK: 
SWCLK1: pad.3@27.4,-6.969 U4.24 | length 37.8
  Top Layer w0.15: v3(27.141,-7.234) 27.141,-7.229 pad.3@27.4,-6.969
  Top Layer w0.2: U4.24 15.489,-32.304 v3(15.489,-32.042)
  Layer 1 w0.15: v3(15.489,-32.042) 15.489,-32.2 16.046,-32.756 19.462,-32.756 20.217,-32.002 20.217,-20.788 19.837,-20.408 19.837,-19.215 20.217,-18.836 20.217,-11.715 21.273,-10.659 26.843,-10.659 27.285,-10.217 27.285,-9.719 27.29,-9.714 27.29,-7.383 v3(27.141,-7.234)
SWCLK2: 
SWDIO: 
SWDIO1: pad.3@27.4,-8.569 U4.23 | length 35.1
  Top Layer w0.15: v3(26.81,-10.02) 27.325,-9.505 pad.3@27.325,-8.494
  Top Layer w0.2: U4.23 16.089,-32.269 v3(16.089,-32.128)
  Layer 1 w0.15: v3(16.089,-32.128) 16.367,-32.406 19.317,-32.406 19.861,-31.863 19.861,-20.922 19.497,-20.558 19.497,-19.064 19.861,-18.701 19.861,-11.577 21.128,-10.309 26.521,-10.309 v3(26.81,-10.02)
SWDIO2: 
SWRST: 
TX: U4.8
TXD: 
U2-2: 
V3V3: 
VBUS: 
VC: 
VCC: 
VDD: C13.2 CN1.1 CN1.7 Q3.D | length 27
  Top Layer w0.3: v3@14.567,-26.351 14.995,-25.923 CN1.1 ; v3(14.59,-26.377) v3@14.591,-26.375 ; CN1.7 17.995,-23.928 18.227,-23.696 19.028,-23.696 ; Q3.D 19.415,-31.778 ; v3@19.415,-24.711 19.415,-31.778 ; C13.2 19.576,-24.243 19.028,-23.696 ; 19.028,-23.696 19.297,-23.965 v3(19.297,-24.706) 19.297,-31.661 19.415,-31.778
  Bottom Layer w0.3: v3(14.59,-26.377) 15.626,-25.34 18.663,-25.34 v3(19.297,-24.706)
VDD1: C17.1 U5.4 | length 1.4
  Top Layer w0.2: U5.4 19.946,-7.983 C17.1
VDS: C17.2 C19.1 C34.1 Q5.1 Q5.2 Q5.3 R44.1 U5.2 V+.1 | length 20.6
  Top Layer w0.5: C19.1 9.751,-9.878 ; 8.713,-12.303 9.751,-11.265 9.751,-9.878 ; C34.1 17.633,-11.976 17.633,-11.488 U5.2 17.633,-9.88 ; R44.1 19.81,-9.382 19.809,-9.383 18.13,-9.383 17.633,-9.88 ; 9.751,-9.878 12.849,-9.878 12.849,-9.072 13.148,-8.774 15.736,-8.774 16.203,-9.241 16.994,-9.241 17.633,-9.88
  other v1: 6.604,-14.19 5.734,-14.004 8.277,-11.944 7.822,-11.426
VFB: 
VFB1: 
VIN: C37.1 EC6.1 pad.3@24.5,-5.819 Q5.5 Q5.6 Q5.7 Q5.8 R24.1 R43.2 U5.6 | length 39.6
  Top Layer w0.254: 8.275,-7.144 Q5.8@10.749,-7.144 ; R24.1 8.445,-4.931 EC6.1@8.93,-4.446 ; Q5.6@12.849,-3.978 9.398,-3.978 EC6.1@8.93,-4.446 ; Q5.8@13.414,-7.128 13.414,-5.128 9.613,-5.128 EC6.1@8.93,-4.446 ; Q5.8@14.391,-7.647 16.346,-7.647 U5.6@16.683,-7.983
  Top Layer w0.5: R43.2 18.69,-13.831 v2(18.887,-13.634)
  Bottom Layer w0.254: EC6.1@8.93,-4.446 8.93,-5.175 15.525,-11.77 15.525,-14.004 ; 14.817,-13.836 15.067,-14.087
  Bottom Layer w0.5: v2(18.887,-13.634) 18.887,-7.067 v1(19.877,-6.077)
  other v1: 23.352,-6.162 23.952,-6.162 24.552,-6.162 20.477,-6.077 23.352,-5.562 23.952,-5.562 24.552,-5.562 19.877,-5.477 20.477,-5.477
  other v2: 11.523,-7.855 12.123,-7.855 12.723,-7.855 13.323,-7.855 13.923,-7.855 14.523,-7.855 10.923,-7.255 11.523,-7.255 12.123,-7.255 12.723,-7.255 13.323,-7.255 13.923,-7.255 14.523,-7.255 10.323,-6.655 10.923,-6.655 11.523,-6.655 12.123,-6.655 12.723,-6.655 13.323,-6.655 13.923,-6.655 14.523,-6.655 9.723,-6.055 10.323,-6.055 10.923,-6.055 11.523,-6.055 12.123,-6.055 12.723,-6.055 13.323,-6.055 13.923,-6.055 14.523,-6.055 9.123,-5.455 9.723,-5.455 10.323,-5.455 10.923,-5.455 11.523,-5.455 12.123,-5.455 12.723,-5.455 13.323,-5.455 13.923,-5.455 14.523,-5.455 10.323,-4.855 10.923,-4.855 11.523,-4.855 12.123,-4.855 12.723,-4.855 13.323,-4.855 13.923,-4.855 14.523,-4.855 10.323,-4.255 10.923,-4.255 11.523,-4.255 12.123,-4.255 12.723,-4.255 13.323,-4.255 13.923,-4.255 14.523,-4.255
VIN_3V: C3_1.2 C4.2 C6.1 C9.2 C10.1 L1.2 Q3.S R3.2 R8.2 R9.2 TP3.1 U2.4 U2.5 U4.1 U5_1.3 U5_1.7 U5_1.8 | length 69.8
  Top Layer w0.2: C9.2@10.947,-36.608 10.947,-36.176 11.4,-35.723 12.07,-35.723 U4.1
  Top Layer w0.3: C10.1 C10.1@8.38,-31.992 ; U5_1.3 U5_1.3@9.04,-30.168 ; R8.2@10.769,-38.319 R8.2@10.855,-38.404 ; 10.915,-39.827 10.915,-38.344 R8.2 ; 11.2,-39.904 20.125,-39.904 21.376,-38.653 21.376,-36.526 Q3.S 19.972,-35.938 R9.2 ; R3.2 11.387,-23.023 12.423,-24.059 14.39,-24.059 14.79,-23.659 15.887,-23.659 17.623,-21.923 17.623,-20.998 C6.1 18.518,-21.596 U2.4 U2.5
  Top Layer w0.5: U5_1.8@6.516,-24.9 6.516,-25.367 5.75,-26.133 5.75,-29.458 ; U5_1.8@6.653,-24.795 U5_1.7 7.77,-23.44 C4.2 8.924,-22.994 R3.2 ; C10.1@8.389,-31.992 9.04,-31.341 U5_1.3 ; 8.403,-29.286 9.05,-29.934 U5_1.3@9.05,-30.168 ; 8.408,-29.281 8.17,-29.042 6.166,-29.042 5.75,-29.458 ; C9.2@10.883,-36.672 v3(10.597,-36.386) 9.165,-34.954 8.201,-34.954 ; 11.2,-39.904 9.516,-39.904 8.201,-38.589 8.201,-34.954 ; 5.75,-29.458 5.75,-32.503 8.201,-34.954
  Top Layer w1: L1.2 8.57,-21.562 C4.2
VMS: 
VOUT1: C7.1 pad.3@24.5,-7.769 R4_1.2 U1.5 | length 4.8
  Top Layer w0.254: R4_1.2 13.723,-18.953 U1.5
  Top Layer w0.5: U1.5 13.766,-19.443 14.276,-19.952 15.303,-19.952 15.959,-19.296 C7.1
  other v1: 15.903,-18.615 16.405,-18.619 16.913,-18.434 16.505,-18.059 23.352,-7.769 23.952,-7.769 24.552,-7.769
  other v2: 22.059,-8.071 22.059,-7.521
VXO: C34.2 R43.1 U5.1 | length 3.1
  Top Layer w0.5: R43.1 C34.2 16.683,-12.185 U5.1
XGND: 
pads on no net: U2.6 U4.12 U4.14 U4.32

## Polygon pours and split planes (outlines as drawn)
SGND on Bottom Layer "SGND_L04_P128" (solid, remove dead copper, pour order 128): 21.234,-9.277 21.234,-40.677 6.229,-40.677 5.218,-39.666 5.218,-18.421 5.454,-18.186 11.212,-18.186 14.41,-14.988 14.673,-15.252 17.651,-15.252 19.574,-13.33 19.574,-9.673
VIN on Bottom Layer "Bottom Layer-No Net" (solid, remove dead copper, pour order 103): 15.072,-15.141 16.809,-15.141 17.48,-14.47 17.48,-8.002 16.42,-6.942 cw(c16.42,-5.32) 15.273,-6.467 15.2,-6.394 13.193,-4.386 ccw(c11.396,-6.182) 11.396,-3.642 9.82,-3.642 8.551,-3.642 ccw(c8.551,-4.006) 8.187,-4.006 8.187,-4.959 ccw(c8.679,-4.959) 8.331,-5.307 14.263,-11.239 cw(c13.535,-11.967) 14.565,-11.967 14.565,-14.641 ccw(c15.054,-14.641) 15.054,-15.131
SGND on Bottom Layer "Bottom Layer-No Net" (solid, remove dead copper, pour order 57): 7.298,-15.287 9.012,-13.573 9.012,-12.632 9.012,-10.28 9.183,-10.109 11.825,-10.109 12.147,-10.431 13.355,-11.639 13.355,-12.452 13.355,-13.675 13.025,-14.004 10.144,-16.885 8.047,-16.885 7.298,-16.136
VIN on Bottom Layer "Bottom Layer-No Net" (solid, remove dead copper, pour order 62): 16.82,-15.131 17.987,-15.131 18.672,-14.445 18.368,-14.141 18.368,-13.926 18.368,-7.701 17.887,-7.221 17.624,-6.957 16.42,-6.957 15.696,-6.957 15.024,-6.286 cw(c15.609,-5.701) 14.782,-5.701 14.782,-5.43 14.782,-4.323 ccw(c14.429,-4.323) 14.429,-3.97 8.591,-3.97 ccw(c8.591,-4.378) 8.184,-4.378 8.184,-4.95 ccw(c8.688,-4.95) 8.331,-5.307 14.32,-11.296 cw(c14.175,-11.44) 14.38,-11.44 14.38,-14.473 ccw(c15.045,-14.473) 15.045,-15.138
VOUT1 on Bottom Layer "VOUT1_L04_P115" (solid, remove dead copper, pour order 115): 25.358,-7.181 22.066,-7.181 19.605,-9.642 19.605,-14.551 15.632,-18.524 15.632,-19.781 15.687,-19.837 16.852,-19.837 16.926,-19.762 16.926,-18.902 20.612,-15.216 20.612,-10.181 22.438,-8.355 25.338,-8.355 25.338,-7.186 25.359,-7.165
VDS on Top Layer "Bottom Layer-No Net" (solid, remove dead copper, pour order 58): 5.7,-14.457 7.187,-14.457 10.449,-11.196 11.509,-11.196 12.948,-11.196 13.194,-10.949 13.194,-8.803 13.037,-8.646 9.144,-8.646 8.974,-8.476 8.932,-8.435 8.932,-8.224 8.932,-8.03 8.78,-7.877 7.883,-7.877 7.481,-7.877 7.395,-7.962 7.263,-8.094 7.263,-8.613 7.263,-10.496 6.643,-11.117 6.633,-11.127 5.968,-11.127 5.379,-11.715 5.379,-14.137 5.7,-14.457
NetC1_1 on Top Layer "NETC1_1_L01_P114" (solid, remove dead copper, pour order 114): 9.198,-17.984 9.198,-20.475 10.065,-21.342 11.613,-21.342 13.105,-19.849 13.105,-18.434 13.116,-18.423 12.436,-18.423 12.147,-18.711 12.147,-19.092 11.975,-19.265 10.932,-19.265 10.798,-19.131 10.798,-18.002 10.806,-17.994 9.23,-17.994 9.214,-17.978
VOUT1 on Top Layer "VOUT1_L01_P116" (solid, remove dead copper, pour order 116): 16.38,-17.778 15.629,-18.529 15.629,-19.779 15.66,-19.81 16.904,-19.81 16.973,-19.741 16.973,-18.876 17.226,-18.624 17.226,-18.276 16.727,-17.778
SGND on Top Layer "SGND_L01_P117" (solid, remove dead copper, pour order 117): 21.861,-12.853 21.861,-41.13 22.158,-41.427 4.113,-41.427 3.731,-41.045 3.731,-9.838 5.259,-8.309 22.54,-8.309 21.818,-9.031 21.818,-12.895
VIN_3V on Top Layer "VIN_3V_L01_P118" (solid, remove dead copper, pour order 118): 19.645,-34.667 19.059,-35.254 19.059,-38.499 21.141,-38.499 21.366,-38.724 21.366,-35.029 20.946,-34.609
SCL1 on Top Layer "SCL1_L01_P131" (solid, remove dead copper, pour order 131): 17.148,-23.824 17.365,-24.041 17.365,-31.712 18.568,-31.712 18.939,-31.341 18.939,-23.987
SWDIO1 on Top Layer "SWDIO1_L01_P132" (solid, remove dead copper, pour order 132): 26.513,-7.781 28.432,-7.781 28.388,-7.825 28.388,-9.391 28.291,-9.294 26.469,-9.294 26.469,-7.772 26.451,-7.755
SWCLK1 on Top Layer "SWCLK1_L01_P133" (solid, remove dead copper, pour order 133): 26.442,-6.207 28.362,-6.207 28.318,-6.251 28.318,-7.817 28.22,-7.719 26.398,-7.719 26.398,-6.198 26.38,-6.18
SDA on Top Layer "SDA_L01_P134" (solid, remove dead copper, pour order 134): 26.495,-4.623 28.415,-4.623 28.371,-4.668 28.371,-6.233 28.273,-6.136 26.451,-6.136 26.451,-4.615 26.433,-4.597
SCL on Top Layer "SCL_L01_P135" (solid, remove dead copper, pour order 135): 26.54,-3.049 28.459,-3.049 28.415,-3.093 28.415,-4.659 28.318,-4.561 26.495,-4.561 26.495,-3.04 26.478,-3.022
VIN on Layer 2 "VIN_L02_P122" (solid, remove dead copper, pour order 122): 5.181,-10.491 5.181,-3.375 6.981,-1.575 20.103,-1.575 20.731,-2.203 20.731,-6.379 20.521,-6.589 18.903,-6.589 18.14,-5.826 18.14,-4.602 17.318,-3.78 17.318,-3.773 9.874,-3.773 9.668,-3.98 9.715,-4.027 14.69,-4.027 14.816,-4.153 14.816,-5.949 15.83,-6.963 16.56,-6.963 17.538,-7.941 17.538,-10.491
SGND on Layer 2 "SGND_L02_P124" (solid, remove dead copper, pour order 124): 25.242,-1.598 22.05,-1.598 21.123,-2.526 21.123,-6.42 14.673,-12.869 14.673,-14.84 11.369,-18.144 4.99,-18.144 4.964,-18.169 4.964,-39.811 5.86,-40.707 21.679,-40.707 21.871,-40.516 21.871,-9.181 25.301,-5.75 25.301,-1.59
SGND on Layer 2 "SGND_L02_P125" (solid, remove dead copper, pour order 125): 9.138,-12.877 9.138,-12.987 7.438,-14.687 5.503,-14.687 5.394,-14.578 5.394,-17.667 5.472,-17.745 10.808,-17.745 13.96,-14.594 13.96,-11.504 13.554,-11.099 9.747,-11.099 9.138,-11.707 9.138,-12.955 9.123,-12.971
VDS on Layer 2 "VDS_L02_P126" (solid, remove dead copper, pour order 126): 7.067,-10.761 5.195,-10.761 5.122,-10.834 5.122,-13.93 5.603,-14.411 7.224,-14.411 8.856,-12.779 8.856,-11.179 8.427,-10.751 7.067,-10.751
VIN on Layer 1 "VIN_L03_P123" (solid, remove dead copper, pour order 123): 15.315,-10.388 5.854,-10.388 5.167,-9.702 5.167,-1.731 6.172,-0.727 19.3,-0.727 20.539,-1.966 20.539,-4.863 20.742,-5.067 25.422,-5.067 25.434,-5.078 25.434,-6.607 25.351,-6.69 18.952,-6.69 18.132,-5.87 18.132,-4.584 17.321,-3.773 10.006,-3.773 9.601,-4.178 9.601,-4.374 9.848,-4.374 10.189,-4.033 14.725,-4.033 14.875,-4.183 14.875,-10.144 14.635,-10.384
SGND on Layer 1 "SGND_L03_P127" (solid, remove dead copper, pour order 127): 20.696,-6.868 14.433,-13.132 14.433,-15.073 11.345,-18.16 5.294,-18.16 5.294,-41.467 5.393,-41.566 21.61,-41.566 21.945,-41.231 21.945,-9.097 24.293,-6.749 24.318,-6.749 24.255,-6.812 20.723,-6.812
SGND on Layer 1 "SGND_L03_P129" (solid, remove dead copper, pour order 129): 13.773,-11.475 13.773,-14.739 10.861,-17.652 5.548,-17.652 5.276,-17.38 5.276,-14.979 7.532,-14.979 9.18,-13.331 9.18,-12.515 10.445,-11.251 13.565,-11.251 13.741,-11.427
VDS on Layer 1 "VDS_L03_P130" (solid, remove dead copper, pour order 130): 5.324,-10.867 5.324,-14.115 5.644,-14.436 7.084,-14.436 8.684,-12.835 8.684,-12.195 9.612,-11.267 9.612,-10.787 5.436,-10.787 5.388,-10.739

## Keep-outs
Keep-Out Layer:
  circle w0.1: c21.909,-12.399 r0.67
  circle w0.1: c10.897,-33.793 r0.67
  circle w0.1: c21.897,-33.799 r0.67
  circle w0.1: c10.909,-12.393 r0.67
  lines w0.1: 5.228,-4.393 5.225,-9.653 6.724,-9.654 6.723,-10.754 5.225,-10.753 5.21,-37.409 ccw(c8.207,-37.409) 8.207,-40.406 25.296,-40.406 ; 5.232,-4.393 cw(c8.229,-4.393) 8.229,-1.396 25.304,-1.396 cw(c25.304,-4.393) 28.3,-4.393 28.292,-37.407 ; 25.296,-40.404 ccw(c25.296,-37.407) 28.293,-37.407 ; 25.45,-37.6 26.55,-37.6 26.55,-32.4 25.45,-32.4 25.45,-37.6 ; 25.45,-9.369 26.55,-9.369 26.55,-2.669 25.45,-2.669 25.45,-9.369

## Other copper
Top Layer:
  rectangle net VDD: 19.146,-32.838 19.431,-31.223
  rectangle: 6.257,-25.576 8.05,-23.973
  rectangle net VIN_3V: 18.94,-22.091 20.035,-21.099
  rectangle net VDD1: 18.702,-8.372 19.961,-7.694
  pour cut-out: 6.815,-25.845 9.1,-25.845 9.006,-25.751 6.909,-25.751
  pour cut-out: 19.263,-13.492 19.581,-13.492 19.638,-13.55 19.638,-13.723 19.573,-13.789 19.255,-13.789 19.189,-13.723 19.189,-13.566
  pour cut-out: 13.875,-11.845 14.106,-11.614 15.618,-11.614 15.802,-11.798 15.802,-14.347 16.004,-14.548 18.431,-14.548 18.69,-14.29 18.66,-14.26 16.104,-14.26 15.966,-14.123 15.966,-11.732 15.688,-11.454 14.038,-11.454 13.875,-11.617
  pour cut-out: 13.875,-11.614 15.848,-11.614 15.931,-11.697 15.905,-11.723 15.905,-12.155 16.05,-12.155 16.185,-12.021 16.185,-11.517 15.984,-11.316 13.76,-11.316 13.67,-11.407 13.67,-11.412 13.875,-11.617
  pour cut-out: 10.209,-17.733 13.48,-14.463 13.48,-11.797 13.006,-11.323 13.006,-11.206 13.21,-11.002 13.263,-11.002 13.875,-11.614 13.875,-14.636 10.777,-17.733
  pour cut-out: 5.358,-17.373 5.65,-17.665 10.794,-17.665 10.909,-17.781 10.786,-17.904 5.417,-17.904 5.352,-17.839
  region net VDD: 19.467,-25.032 19.756,-24.743 20.103,-24.743 20.272,-24.574 20.272,-23.969 20.115,-23.813 19.313,-23.813 19.191,-23.935 19.191,-24.923 19.27,-25.002
  region net NetC10_2: 5.666,-5.882 6.684,-5.882 6.829,-6.026 6.829,-9.114 6.666,-9.277 5.718,-9.277 5.395,-8.954 5.395,-6.153
  region net SGND: 25.384,-4.465 21.312,-4.465 21.046,-4.2 21.046,-2.647 22.066,-1.627 25.165,-1.627 25.39,-1.853 25.39,-4.459
  region net VIN: 25.4,-5.058 19.774,-5.058 19.476,-5.356 19.476,-6.353 19.688,-6.564 25.4,-6.564
  region net VOUT1: 25.383,-7.16 22.038,-7.16 21.797,-7.401 21.797,-8.215 21.953,-8.371 25.383,-8.371
  pour cut-out: 20.297,-15.499 18.695,-15.499 18.574,-15.62 18.574,-17.798 18.286,-18.087 18.286,-19.787 18.407,-19.908 19.416,-19.908 19.659,-19.665 19.659,-18.527 19.735,-18.451 19.993,-18.451 20.046,-18.504 20.046,-16.258 20.289,-16.015 20.289,-15.522
  pour cut-out: 19.544,-12.456 19.544,-17.301 19.631,-17.388 21.43,-17.388 21.459,-17.359 21.778,-17.359 21.836,-17.301 21.836,-13.355 20.908,-12.427 19.631,-12.427
  region net SGND: 7.428,-5.303 ccw(c7.428,-5.116) 7.615,-5.116 7.615,-2.683 ccw(c7.136,-2.683) 7.136,-2.204 ccw(c7.136,-3.799) 5.541,-3.799 5.541,-5.139 ccw(c5.706,-5.139) 5.706,-5.303
  region net NetKEY1_1: 16.195,-4.148 17.058,-4.148 17.528,-4.618 18.115,-6.523 16.443,-6.387 16.321,-6.387 cw(c16.321,-5.437) 15.372,-5.437 15.372,-4.963 cw(c16.187,-4.963) 16.187,-4.147
  region net VIN: 16.945,-8.54 16.432,-8.54 16.017,-8.125 9.473,-8.125 cw(c9.473,-8.015) 9.363,-8.015 9.363,-7.921 ccw(c8.872,-7.921) 8.872,-7.429 8.208,-7.429 cw(c8.208,-7.193) 7.971,-7.193 7.971,-2.058 cw(c8.375,-2.058) 8.375,-1.654 19.878,-1.654 cw(c19.878,-2.381) 20.606,-2.381 20.606,-4.373 21.672,-5.439 21.914,-5.439 21.914,-6.43 21.78,-6.564 18.863,-6.564 18.46,-6.161 18.131,-5.194 18.131,-4.596 17.301,-3.766 15.297,-3.766 14.688,-3.157 9.798,-3.157 9.574,-3.381 9.574,-3.81 9.677,-3.913 9.801,-3.789 9.801,-3.487 9.913,-3.374 14.573,-3.374 14.816,-3.618 14.816,-5.931 15.019,-6.133 15.019,-7.357 15.354,-7.022 16.492,-7.022 17.041,-7.57 17.041,-8.444
Layer 2:
  region net SGND: 7.227,-5.31 5.836,-5.31 5.424,-4.898 5.424,-4.257 cw(c7.815,-4.257) 6.124,-2.566 cw(c6.343,-2.785) 6.343,-2.475 7.348,-2.475 7.56,-2.688 7.56,-4.976
Bottom Layer:
  rectangle net SCL: 26.852,-4.043 28.043,-3.491
  rectangle net SDA: 26.852,-5.643 28.043,-5.091
  rectangle net SWCLK1: 26.852,-7.243 28.043,-6.691
  region net SGND: 9.012,-11.562 9.012,-13.39 7.49,-14.912 5.686,-14.912 5.384,-15.215 5.384,-17.399 5.65,-17.665 10.772,-17.665 13.48,-14.957 13.48,-14.463 12.661,-13.643 10.703,-13.643 9.907,-12.847 9.907,-11.587 9.824,-11.504 9.05,-11.504 9.01,-11.544
  region net VDS: 5.7,-14.457 7.187,-14.457 8.553,-13.092 8.553,-11.676 7.994,-11.117 5.978,-11.117 5.387,-11.708 5.387,-14.145
  region net VIN: 14.429,-3.97 14.77,-4.311 14.77,-5.975 15.267,-6.472 15.267,-7.406 14.826,-7.847 13.159,-7.847 11.871,-6.558 11.871,-4.271 12.172,-3.97
  region net VIN: 25.4,-5.058 19.774,-5.058 19.476,-5.356 19.476,-6.353 19.688,-6.564 25.4,-6.564
  region net SGND: 25.384,-4.465 18.001,-4.465 17.301,-3.766 10.137,-3.766 9.804,-3.433 8.102,-3.433 7.615,-3.92 7.615,-5.116 13.899,-11.4 13.899,-14.538 11.552,-16.885 8.047,-16.885 7.298,-16.136 7.298,-15.287 9.296,-13.289 12.007,-13.289 12.339,-12.957 12.339,-12.121 11.763,-11.544 9.01,-11.544 5.539,-8.074 5.539,-3.883 cw(c7.106,-3.883) 5.998,-2.775 6.395,-2.378 cw(c8.191,-4.174) 8.191,-1.634 25.038,-1.634 cw(c25.038,-1.98) 25.383,-1.98

## Silkscreen, mask and mechanical layers (free items; w line width, h text height)
Top Overlay:
  circle w0.1: c16.412,-5.352 r0.9
  circle w0.05: c16.412,-5.352 r1.591
  lines w0.1: 8.854,-4.912 cw(c8.855,-4.537) 8.855,-4.162 ; 10.297,-34.091 10.296,-35.294 11.496,-35.295 11.497,-34.091 ; 10.297,-33.494 10.298,-32.294 11.498,-32.295 11.497,-33.495 ; 10.308,-12.691 10.308,-13.894 11.508,-13.895 11.508,-12.691 ; 10.309,-12.094 10.309,-10.894 11.509,-10.895 11.509,-12.095 ; 12.545,-25.196 12.545,-30.396 20.945,-30.396 20.945,-25.196 ; 13.745,-30.396 13.745,-29.596 19.745,-29.596 19.745,-30.396 ; 21.297,-34.097 21.296,-35.3 22.496,-35.301 22.497,-34.097 ; 21.297,-33.5 21.298,-32.3 22.498,-32.301 22.497,-33.501 ; 21.308,-12.697 21.308,-13.9 22.508,-13.901 22.508,-12.697 ; 21.309,-12.1 21.309,-10.9 22.509,-10.901 22.509,-12.101 ; 25.162,-6.603 7.662,-6.594 ccw(c7.661,-7.494) 6.761,-7.493 6.744,-38.693 ccw(c7.644,-38.694) 7.644,-39.594 25.144,-39.603 ccw(c25.144,-38.703) 26.044,-38.704 26.045,-37.556 ; 27.957,-31.758 27.969,-8.892 ; 6.604,-4.91 cw(c6.605,-4.535) 6.605,-4.16 6.855,-4.161 cw(c6.855,-4.536) 6.854,-4.911 6.604,-4.91
Bottom Overlay:
  lines w0.1: 6.723,-10.714 28.3,-10.714 28.3,-9.714 6.724,-9.714 ; 21.45,-40.406 21.45,-1.434 ; 27.409,-39.908 27.409,-0.936 ; 28.409,-39.908 28.409,-0.936
  text "SWDIO" at 28.307,-41.875 h0.6
  text "VCC" at 24.194,-43.742 h0.6
  text "GND" at 28.261,-44.321 h0.6
  text "B00T0" at 24.582,-45.204 h0.6
  text "SWCLK" at 25.06,-45.562 h0.6
  text "SWRST" at 28.277,-46.839 h0.6
Top Solder:
  rectangle: 9.435,-8.091 14.736,-3.538
  rectangle: 9.02,-2.935 19.94,-1.786
Bottom Solder:
  rectangle: 10.645,-3.438 20.791,-1.814